# Altium PCB PCB1.PcbDoc
Units mil, origin at the board's own origin, x right, y up, seen from the top; angles counter-clockwise.
Board outline 1470 x 845 mil, 2 copper layers (Top Layer, Bottom Layer); 17 components, 10 nets, 55 pads, 8 vias.
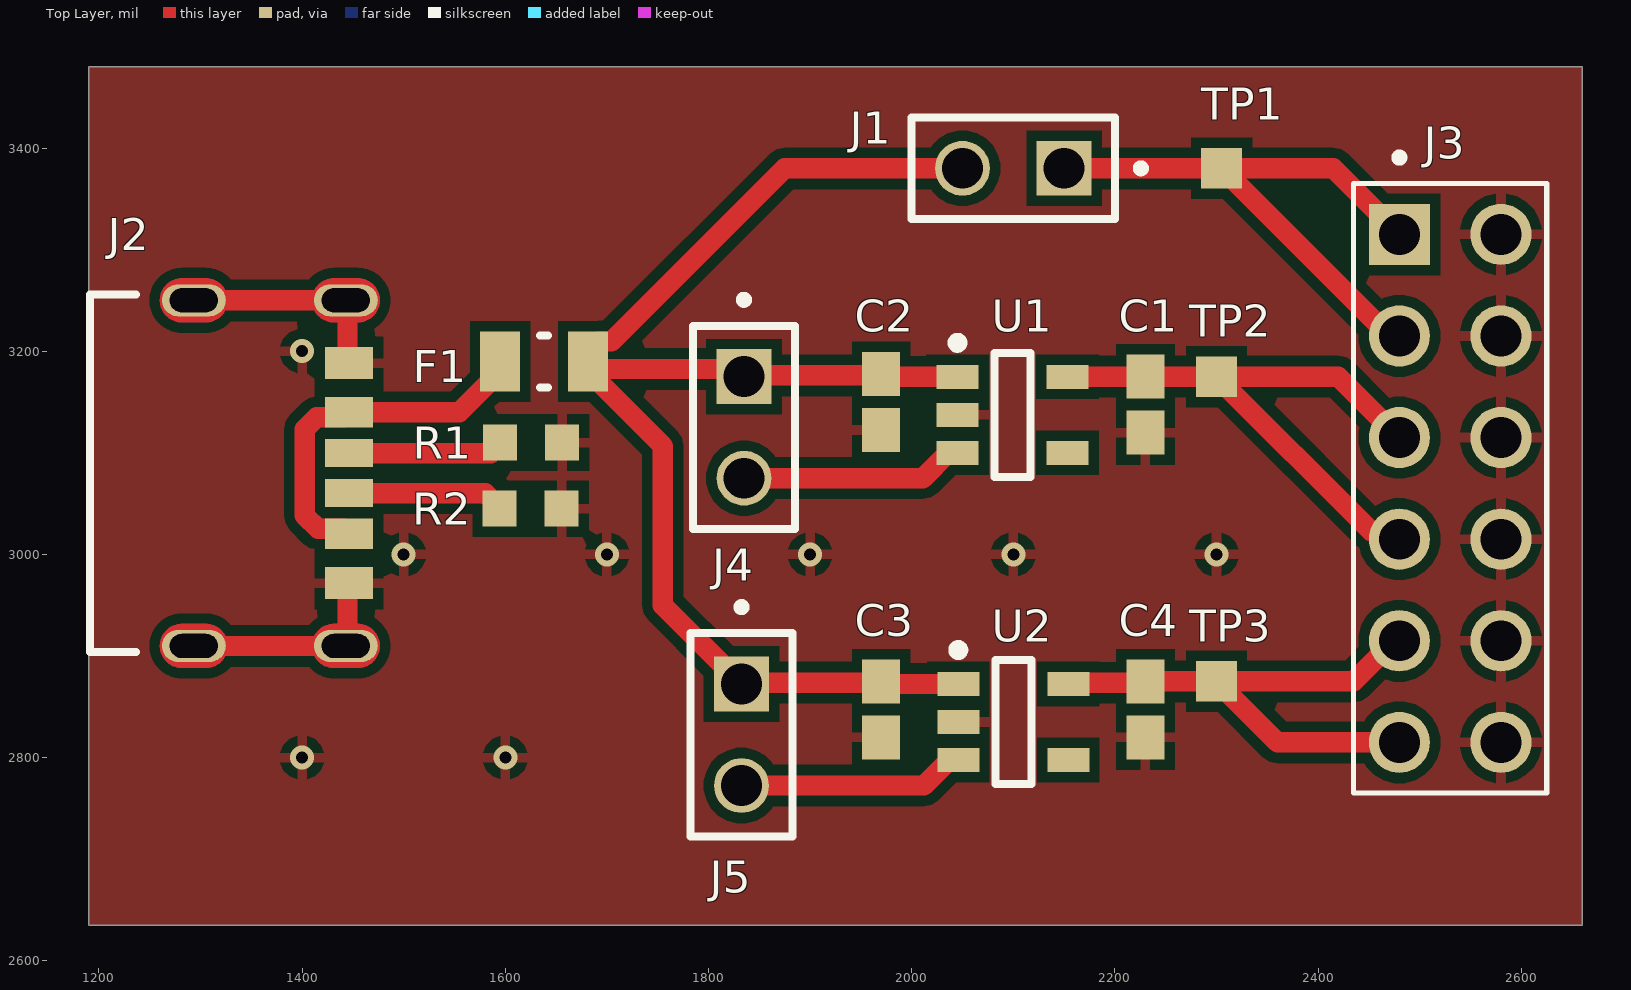
[diagram p0: Top Layer view]
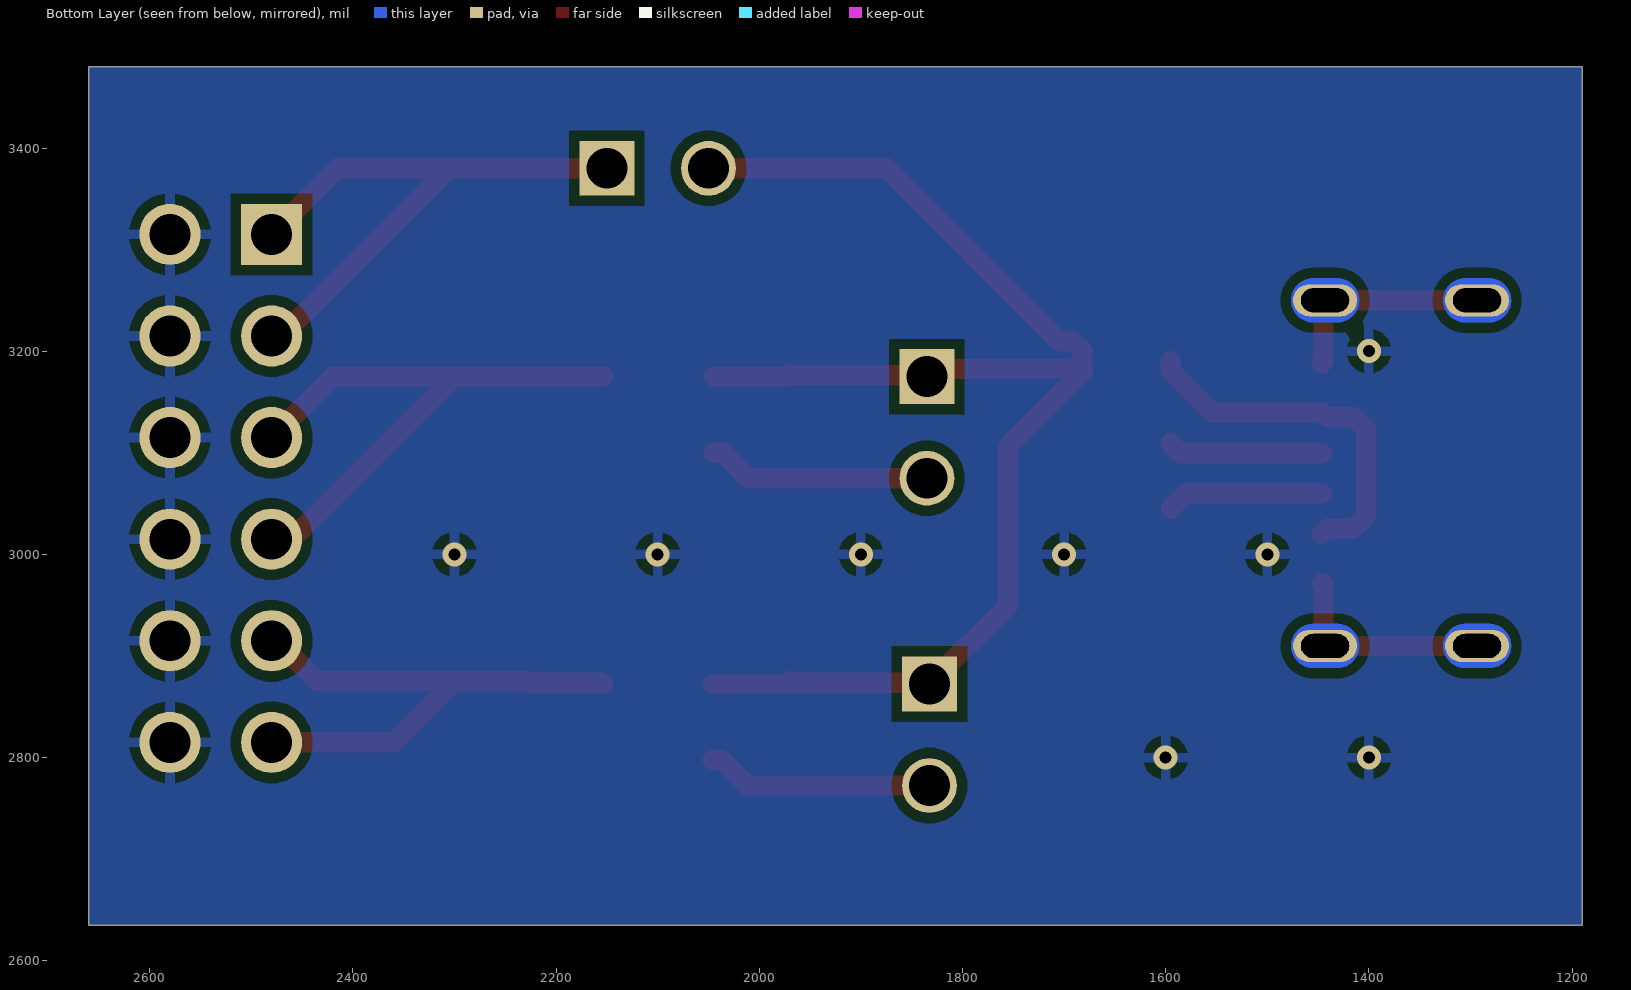
[diagram p1: Bottom Layer view, seen from below]
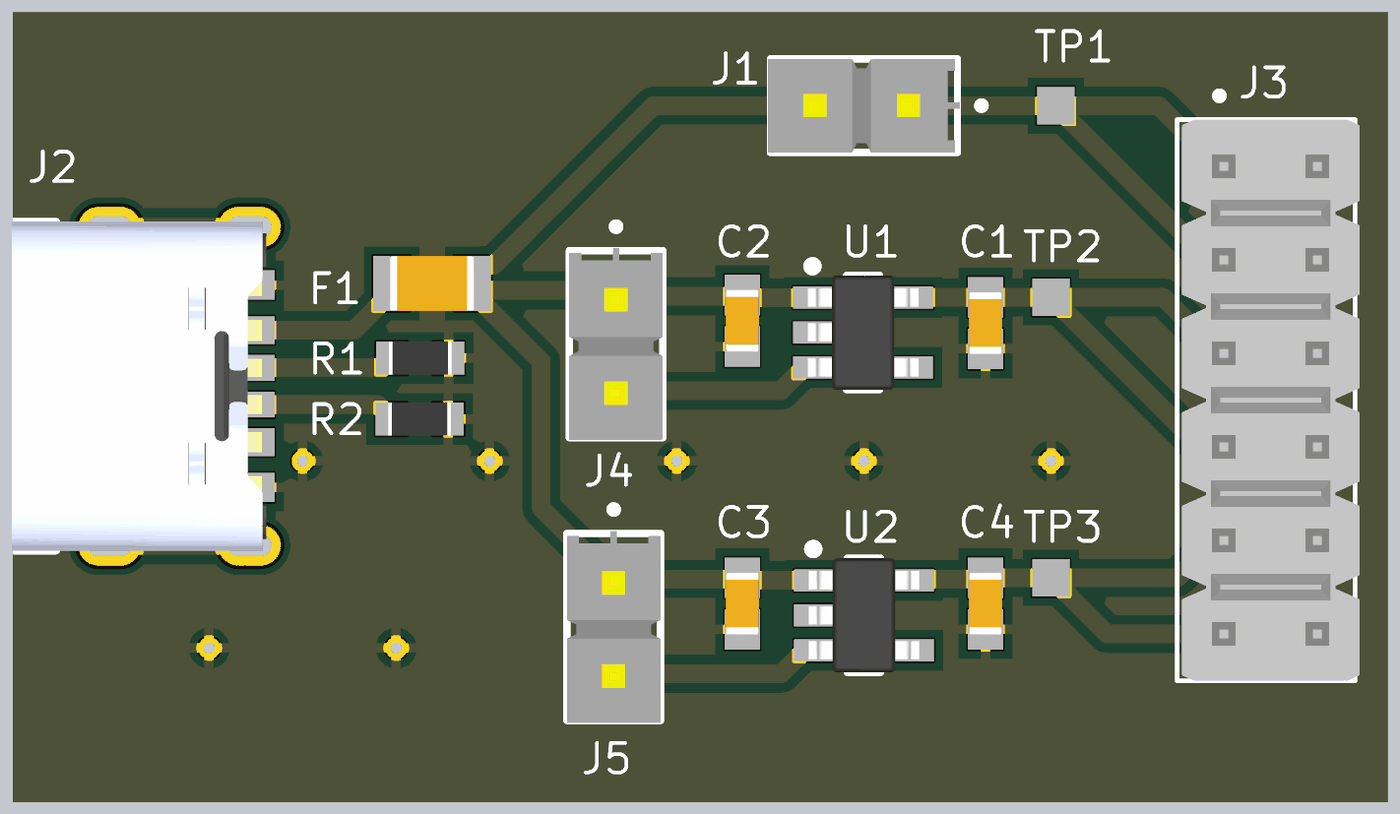
[diagram p2: 3D render of the assembled board from above, using the file's embedded part models]

## Layer stack, top to bottom
Top Solder: solder mask 0.4, Solder Resist, Dk 3.5
Top Layer: signal copper 1.4
Dielectric 1: dielectric 12.6, FR-4, Dk 4.8
Bottom Layer: signal copper 1.4
Bottom Solder: solder mask 0.4, Solder Resist, Dk 3.5

## Board outline
1190,2635 2660,2635 2660,3480 1190,3480

## Design rules (kind name [scope] priority, off if disabled: settings)
Clearance [All] p1: gap=10 ignorepadtopadclearanceinfootprint=FALSE
HoleSize [All] p1: absolutevalues=TRUE maxlimit=100 minlimit=11.81 maxpercent=80.000 minpercent=20.000
HoleToHoleClearance [All] p1: gap=19.68 allowstackedmicrovias=TRUE
MinimumSolderMaskSliver [All] p1: minsoldermaskwidth=3.94
PolygonConnect [All] p1: connectstyle=Relief reliefconductorwidth=10 reliefentries=4 polygonreliefangle="90 Angle" airgapwidth=10
RoutingVias [All] p1: holewidth=28 width=50 viastyle="Through Hole" minholewidth=28 minwidth=50 maxholewidth=28 maxwidth=50
SolderMaskExpansion [All] p1: expansion=1.97 istentingtop=FALSE
SupplyNets "Schematic Supply Nets" [InNet('GND')] p1: voltage=0.000
Width "Power Rule" [InNetClass('Power')] p1: maxlimit=40 minlimit=16 preferedwidth=20
Width Default [All] p2: maxlimit=40 minlimit=8 preferedwidth=10
Width [All] p3: maxlimit=10 minlimit=8 preferedwidth=10
27 further rules are at their usual default settings.

## Components (designator, comment, footprint, x,y, rotation, side; value= is the part's Value field where it differs from the comment)
C1 "1uF" CAP_0603 2230,3147.44 r90 top value="1 uF"
C2 "1uF" CAP_0603 1970,3150 r90 top value="1 uF"
C3 "1uF" CAP_0603 1970,2847.44 r90 top value="1 uF"
C4 "1uF" CAP_0603 2230,2847.44 r90 top value="1 uF"
F1 "MF-PSMF050X-2" MF-PSMF050X 1638.31,3190 r0 top
J1 "TSW-102-07-G-S" TSW-102-07-G-S 2100,3380 r180 top
J2 "USBC_POWERONLY_Horizontal" USBC_POWERDELIVERY_HORIZONTAL 1330,3085 r270 top
J3 "10129381-912002BLF" 10129381-912002BLF 2530,3065 r270 top
J4 "TSW-102-07-G-S" TSW-102-07-G-S 1835,3125 r270 top
J5 "TSW-102-07-G-S" TSW-102-07-G-S 1832.5,2822.5 r270 top
R1 "5.1K" RES_0603 1625.51,3110 r0 top value="5.1 kOhm"
R2 "5.1K" RES_0603 1625,3045 r0 top value="5.1 kOhm"
TP1 "TestPoint_0.4mm" TestPoint_0.4mm_SMD 2305,3380 r90 top
TP2 "TestPoint_0.4mm" TestPoint_0.4mm_SMD 2300,3175 r90 top
TP3 "TestPoint_0.4mm" TestPoint_0.4mm_SMD 2300,2875 r90 top
U1 "AP2112K-3.3TRG1" AP2112K-3.3TRG1 2099.13,3137.4 r0 top
U2 "AP2112K-1.8TRG1" AP2112K-1.8TRG1 2100,2835 r0 top

## Footprints (in the part's own frame and the unit in brackets; to place one, negate y for a bottom-side part, rotate by r counter-clockwise, add the part's x,y. Pads: shape width x height; smd on the part's side, far side on the other; paste and mask are expansions set on the pad)
10129381-912002BLF [mm]
  rect 1.53x1.53 / inner round 1.53 / far side rect 1.53x1.53 hole 1.02: 1(-6.35,-1.27)
  round 1.53 hole 1.02: 2(-6.35,1.27) 3(-3.81,-1.27) 4(-3.81,1.27) 5(-1.27,-1.27) 6(-1.27,1.27) 7(1.27,-1.27) 8(1.27,1.27) 9(3.81,-1.27) 10(3.81,1.27) 11(6.35,-1.27) 12(6.35,1.27)
  silkscreen extent -8.37,-2.41 7.62,2.41, body extent -7.62,-2.29 7.62,2.54, height 8.18
AP2112K-1.8TRG1 [mm]
  rect 1.05x0.6 smd: 1(-1.375,0.95) 2(-1.375,0) 3(-1.375,-0.95) 4(1.375,-0.95) 5(1.375,0.95)
  silkscreen extent -1.5,-1.55 0.45,1.92, body extent -1.5,-1.55 1.5,1.55, height 1.3
AP2112K-3.3TRG1 [mm]
  rect 1.05x0.6 smd: 1(-1.375,0.95) 2(-1.375,0) 3(-1.375,-0.95) 4(1.375,-0.95) 5(1.375,0.95)
  silkscreen extent -1.5,-1.55 0.45,1.92, body extent -1.5,-1.55 1.5,1.55, height 1.3
CAP_0603 [mm]
  rect 1.1x0.95 smd: 1(-0.7,0) 2(0.7,0)
  body extent -0.85,-0.45 0.85,0.45, height 0.9
MF-PSMF050X [mm]
  rect 1x1.5 smd: 1(-1.1,0) 2(1.1,0)
  silkscreen extent -0.1,-0.65 0.1,0.65, body extent -1.15,-0.75 1.15,0.75, height 0.85
RES_0603 [mm] "Chip Resistor, 2-Leads, Body 1.60x0.80mm, IPC Medium Density"
  rect 0.85x0.9 smd: 1(-0.775,0) 2(0.775,0)
  body extent -0.85,-0.45 0.85,0.45, height 0.55
TestPoint_0.4mm_SMD [mil]
  rect 40x40 smd: 1(0,0)
TSW-102-07-G-S [mm]
  rect 1.37x1.37 / inner round 1.37 / far side rect 1.37x1.37 hole 1.02: 1(-1.27,0)
  round 1.37 hole 1.02: 2(1.27,0)
  silkscreen extent -3.29,-1.27 2.54,1.27, body extent -2.6,-1.27 2.6,1.27, height 8.38
USBC_POWERDELIVERY_HORIZONTAL [mm]
  rect 0.7x1.2 smd: A5(-0.373,2.953) B5(0.627,2.953)
  rect 0.76x1.2 smd: A9(1.647,2.953) B9(-1.393,2.953)
  rect 0.8x1.2 smd: A12(2.877,2.953) B12(-2.623,2.953)
  oval 0.8x1.6 hole 0.6 slot 1.2 at 90 deg mask+0: S1(-4.193,2.873) S2(4.447,2.873) S3(-4.193,-0.927) S4(4.447,-0.927)
  Top Layer region: -4.164,-0.078 -4.136,-0.08 -4.107,-0.084 -4.079,-0.089 -4.051,-0.096 -4.023,-0.104 -3.996,-0.114 -3.969,-0.125 -3.943,-0.137 -3.918,-0.151 -3.893,-0.166 -3.87,-0.182 -3.847,-0.2 -3.825,-0.218 -3.804,-0.238 -3.784,-0.259 -3.766,-0.281 -3.748,-0.304 -3.732,-0.327 -3.717,-0.352 -3.703,-0.377 -3.691,-0.403 -3.68,-0.43 -3.67,-0.457 -3.662,-0.485 -3.655,-0.513 -3.65,-0.541 -3.646,-0.57 -3.644,-0.598 -3.643,-0.627 -3.643,-1.227 -3.644,-1.256 -3.646,-1.284 -3.65,-1.313 -3.655,-1.341 -3.662,-1.369 -3.67,-1.397 -3.68,-1.424 -3.691,-1.451 -3.703,-1.477 -3.717,-1.502 -3.732,-1.527 -3.748,-1.55 -3.766,-1.573 -3.784,-1.595 -3.804,-1.616 -3.825,-1.636 -3.847,-1.654 -3.87,-1.672 -3.893,-1.688 -3.918,-1.703 -3.943,-1.717 -3.969,-1.729 -3.996,-1.74 -4.023,-1.75 -4.051,-1.758 -4.079,-1.765 -4.107,-1.77 -4.136,-1.774 -4.164,-1.776 -4.193,-1.777 -4.222,-1.776 -4.25,-1.774 -4.279,-1.77 -4.307,-1.765 -4.335,-1.758 -4.363,-1.75 -4.39,-1.74 -4.417,-1.729 -4.443,-1.717 -4.468,-1.703 -4.493,-1.688 -4.516,-1.672 -4.539,-1.654 -4.561,-1.636 -4.582,-1.616 -4.602,-1.595 -4.62,-1.573 -4.638,-1.55 -4.654,-1.527 -4.669,-1.502 -4.683,-1.477 -4.695,-1.451 -4.706,-1.424 -4.716,-1.397 -4.724,-1.369 -4.731,-1.341 -4.736,-1.313 -4.74,-1.284 -4.742,-1.256 -4.743,-1.227 -4.743,-0.627 -4.742,-0.598 -4.74,-0.57 -4.736,-0.541 -4.731,-0.513 -4.724,-0.485 -4.716,-0.457 -4.706,-0.43 -4.695,-0.403 -4.683,-0.377 -4.669,-0.352 -4.654,-0.327 -4.638,-0.304 -4.62,-0.281 -4.602,-0.259 -4.582,-0.238 -4.561,-0.218 -4.539,-0.2 -4.516,-0.182 -4.493,-0.166 -4.468,-0.151 -4.443,-0.137 -4.417,-0.125 -4.39,-0.114 -4.363,-0.104 -4.335,-0.096 -4.307,-0.089 -4.279,-0.084 -4.25,-0.08 -4.222,-0.078 -4.193,-0.077
  Top Layer region: 4.476,-0.078 4.504,-0.08 4.533,-0.084 4.561,-0.089 4.589,-0.096 4.617,-0.104 4.644,-0.114 4.671,-0.125 4.697,-0.137 4.722,-0.151 4.747,-0.166 4.77,-0.182 4.793,-0.2 4.815,-0.218 4.836,-0.238 4.856,-0.259 4.874,-0.281 4.892,-0.304 4.908,-0.327 4.923,-0.352 4.937,-0.377 4.949,-0.403 4.96,-0.43 4.97,-0.457 4.978,-0.485 4.985,-0.513 4.99,-0.541 4.994,-0.57 4.996,-0.598 4.997,-0.627 4.997,-1.227 4.996,-1.256 4.994,-1.284 4.99,-1.313 4.985,-1.341 4.978,-1.369 4.97,-1.397 4.96,-1.424 4.949,-1.451 4.937,-1.477 4.923,-1.502 4.908,-1.527 4.892,-1.55 4.874,-1.573 4.856,-1.595 4.836,-1.616 4.815,-1.636 4.793,-1.654 4.77,-1.672 4.747,-1.688 4.722,-1.703 4.697,-1.717 4.671,-1.729 4.644,-1.74 4.617,-1.75 4.589,-1.758 4.561,-1.765 4.533,-1.77 4.504,-1.774 4.476,-1.776 4.447,-1.777 4.418,-1.776 4.39,-1.774 4.361,-1.77 4.333,-1.765 4.305,-1.758 4.277,-1.75 4.25,-1.74 4.223,-1.729 4.197,-1.717 4.172,-1.703 4.147,-1.688 4.124,-1.672 4.101,-1.654 4.079,-1.636 4.058,-1.616 4.038,-1.595 4.02,-1.573 4.002,-1.55 3.986,-1.527 3.971,-1.502 3.957,-1.477 3.945,-1.451 3.934,-1.424 3.924,-1.397 3.916,-1.369 3.909,-1.341 3.904,-1.313 3.9,-1.284 3.898,-1.256 3.897,-1.227 3.897,-0.627 3.898,-0.598 3.9,-0.57 3.904,-0.541 3.909,-0.513 3.916,-0.485 3.924,-0.457 3.934,-0.43 3.945,-0.403 3.957,-0.377 3.971,-0.352 3.986,-0.327 4.002,-0.304 4.02,-0.281 4.038,-0.259 4.058,-0.238 4.079,-0.218 4.101,-0.2 4.124,-0.182 4.147,-0.166 4.172,-0.151 4.197,-0.137 4.223,-0.125 4.25,-0.114 4.277,-0.104 4.305,-0.096 4.333,-0.089 4.361,-0.084 4.39,-0.08 4.418,-0.078 4.447,-0.077
  Top Layer region: -4.164,3.722 -4.136,3.72 -4.107,3.716 -4.079,3.711 -4.051,3.704 -4.023,3.696 -3.996,3.686 -3.969,3.675 -3.943,3.663 -3.918,3.649 -3.893,3.634 -3.87,3.618 -3.847,3.6 -3.825,3.582 -3.804,3.562 -3.784,3.541 -3.766,3.519 -3.748,3.496 -3.732,3.473 -3.717,3.448 -3.703,3.423 -3.691,3.397 -3.68,3.37 -3.67,3.343 -3.662,3.315 -3.655,3.287 -3.65,3.259 -3.646,3.23 -3.644,3.202 -3.643,3.173 -3.643,2.573 -3.644,2.544 -3.646,2.516 -3.65,2.487 -3.655,2.459 -3.662,2.431 -3.67,2.403 -3.68,2.376 -3.691,2.349 -3.703,2.323 -3.717,2.298 -3.732,2.273 -3.748,2.25 -3.766,2.227 -3.784,2.205 -3.804,2.184 -3.825,2.164 -3.847,2.146 -3.87,2.128 -3.893,2.112 -3.918,2.097 -3.943,2.083 -3.969,2.071 -3.996,2.06 -4.023,2.05 -4.051,2.042 -4.079,2.035 -4.107,2.03 -4.136,2.026 -4.164,2.024 -4.193,2.023 -4.222,2.024 -4.25,2.026 -4.279,2.03 -4.307,2.035 -4.335,2.042 -4.363,2.05 -4.39,2.06 -4.417,2.071 -4.443,2.083 -4.468,2.097 -4.493,2.112 -4.516,2.128 -4.539,2.146 -4.561,2.164 -4.582,2.184 -4.602,2.205 -4.62,2.227 -4.638,2.25 -4.654,2.273 -4.669,2.298 -4.683,2.323 -4.695,2.349 -4.706,2.376 -4.716,2.403 -4.724,2.431 -4.731,2.459 -4.736,2.487 -4.74,2.516 -4.742,2.544 -4.743,2.573 -4.743,3.173 -4.742,3.202 -4.74,3.23 -4.736,3.259 -4.731,3.287 -4.724,3.315 -4.716,3.343 -4.706,3.37 -4.695,3.397 -4.683,3.423 -4.669,3.448 -4.654,3.473 -4.638,3.496 -4.62,3.519 -4.602,3.541 -4.582,3.562 -4.561,3.582 -4.539,3.6 -4.516,3.618 -4.493,3.634 -4.468,3.649 -4.443,3.663 -4.417,3.675 -4.39,3.686 -4.363,3.696 -4.335,3.704 -4.307,3.711 -4.279,3.716 -4.25,3.72 -4.222,3.722 -4.193,3.723
  Top Layer region: 4.476,3.722 4.504,3.72 4.533,3.716 4.561,3.711 4.589,3.704 4.617,3.696 4.644,3.686 4.671,3.675 4.697,3.663 4.722,3.649 4.747,3.634 4.77,3.618 4.793,3.6 4.815,3.582 4.836,3.562 4.856,3.541 4.874,3.519 4.892,3.496 4.908,3.473 4.923,3.448 4.937,3.423 4.949,3.397 4.96,3.37 4.97,3.343 4.978,3.315 4.985,3.287 4.99,3.259 4.994,3.23 4.996,3.202 4.997,3.173 4.997,2.573 4.996,2.544 4.994,2.516 4.99,2.487 4.985,2.459 4.978,2.431 4.97,2.403 4.96,2.376 4.949,2.349 4.937,2.323 4.923,2.298 4.908,2.273 4.892,2.25 4.874,2.227 4.856,2.205 4.836,2.184 4.815,2.164 4.793,2.146 4.77,2.128 4.747,2.112 4.722,2.097 4.697,2.083 4.671,2.071 4.644,2.06 4.617,2.05 4.589,2.042 4.561,2.035 4.533,2.03 4.504,2.026 4.476,2.024 4.447,2.023 4.418,2.024 4.39,2.026 4.361,2.03 4.333,2.035 4.305,2.042 4.277,2.05 4.25,2.06 4.223,2.071 4.197,2.083 4.172,2.097 4.147,2.112 4.124,2.128 4.101,2.146 4.079,2.164 4.058,2.184 4.038,2.205 4.02,2.227 4.002,2.25 3.986,2.273 3.971,2.298 3.957,2.323 3.945,2.349 3.934,2.376 3.924,2.403 3.916,2.431 3.909,2.459 3.904,2.487 3.9,2.516 3.898,2.544 3.897,2.573 3.897,3.173 3.898,3.202 3.9,3.23 3.904,3.259 3.909,3.287 3.916,3.315 3.924,3.343 3.934,3.37 3.945,3.397 3.957,3.423 3.971,3.448 3.986,3.473 4.002,3.496 4.02,3.519 4.038,3.541 4.058,3.562 4.079,3.582 4.101,3.6 4.124,3.618 4.147,3.634 4.172,3.649 4.197,3.663 4.223,3.675 4.25,3.686 4.277,3.696 4.305,3.704 4.333,3.711 4.361,3.716 4.39,3.72 4.418,3.722 4.447,3.723
  Bottom Layer region: -4.164,-0.078 -4.136,-0.08 -4.107,-0.084 -4.079,-0.089 -4.051,-0.096 -4.023,-0.104 -3.996,-0.114 -3.969,-0.125 -3.943,-0.137 -3.918,-0.151 -3.893,-0.166 -3.87,-0.182 -3.847,-0.2 -3.825,-0.218 -3.804,-0.238 -3.784,-0.259 -3.766,-0.281 -3.748,-0.304 -3.732,-0.327 -3.717,-0.352 -3.703,-0.377 -3.691,-0.403 -3.68,-0.43 -3.67,-0.457 -3.662,-0.485 -3.655,-0.513 -3.65,-0.541 -3.646,-0.57 -3.644,-0.598 -3.643,-0.627 -3.643,-1.227 -3.644,-1.256 -3.646,-1.284 -3.65,-1.313 -3.655,-1.341 -3.662,-1.369 -3.67,-1.397 -3.68,-1.424 -3.691,-1.451 -3.703,-1.477 -3.717,-1.502 -3.732,-1.527 -3.748,-1.55 -3.766,-1.573 -3.784,-1.595 -3.804,-1.616 -3.825,-1.636 -3.847,-1.654 -3.87,-1.672 -3.893,-1.688 -3.918,-1.703 -3.943,-1.717 -3.969,-1.729 -3.996,-1.74 -4.023,-1.75 -4.051,-1.758 -4.079,-1.765 -4.107,-1.77 -4.136,-1.774 -4.164,-1.776 -4.193,-1.777 -4.222,-1.776 -4.25,-1.774 -4.279,-1.77 -4.307,-1.765 -4.335,-1.758 -4.363,-1.75 -4.39,-1.74 -4.417,-1.729 -4.443,-1.717 -4.468,-1.703 -4.493,-1.688 -4.516,-1.672 -4.539,-1.654 -4.561,-1.636 -4.582,-1.616 -4.602,-1.595 -4.62,-1.573 -4.638,-1.55 -4.654,-1.527 -4.669,-1.502 -4.683,-1.477 -4.695,-1.451 -4.706,-1.424 -4.716,-1.397 -4.724,-1.369 -4.731,-1.341 -4.736,-1.313 -4.74,-1.284 -4.742,-1.256 -4.743,-1.227 -4.743,-0.627 -4.742,-0.598 -4.74,-0.57 -4.736,-0.541 -4.731,-0.513 -4.724,-0.485 -4.716,-0.457 -4.706,-0.43 -4.695,-0.403 -4.683,-0.377 -4.669,-0.352 -4.654,-0.327 -4.638,-0.304 -4.62,-0.281 -4.602,-0.259 -4.582,-0.238 -4.561,-0.218 -4.539,-0.2 -4.516,-0.182 -4.493,-0.166 -4.468,-0.151 -4.443,-0.137 -4.417,-0.125 -4.39,-0.114 -4.363,-0.104 -4.335,-0.096 -4.307,-0.089 -4.279,-0.084 -4.25,-0.08 -4.222,-0.078 -4.193,-0.077
  Bottom Layer region: 4.476,-0.078 4.504,-0.08 4.533,-0.084 4.561,-0.089 4.589,-0.096 4.617,-0.104 4.644,-0.114 4.671,-0.125 4.697,-0.137 4.722,-0.151 4.747,-0.166 4.77,-0.182 4.793,-0.2 4.815,-0.218 4.836,-0.238 4.856,-0.259 4.874,-0.281 4.892,-0.304 4.908,-0.327 4.923,-0.352 4.937,-0.377 4.949,-0.403 4.96,-0.43 4.97,-0.457 4.978,-0.485 4.985,-0.513 4.99,-0.541 4.994,-0.57 4.996,-0.598 4.997,-0.627 4.997,-1.227 4.996,-1.256 4.994,-1.284 4.99,-1.313 4.985,-1.341 4.978,-1.369 4.97,-1.397 4.96,-1.424 4.949,-1.451 4.937,-1.477 4.923,-1.502 4.908,-1.527 4.892,-1.55 4.874,-1.573 4.856,-1.595 4.836,-1.616 4.815,-1.636 4.793,-1.654 4.77,-1.672 4.747,-1.688 4.722,-1.703 4.697,-1.717 4.671,-1.729 4.644,-1.74 4.617,-1.75 4.589,-1.758 4.561,-1.765 4.533,-1.77 4.504,-1.774 4.476,-1.776 4.447,-1.777 4.418,-1.776 4.39,-1.774 4.361,-1.77 4.333,-1.765 4.305,-1.758 4.277,-1.75 4.25,-1.74 4.223,-1.729 4.197,-1.717 4.172,-1.703 4.147,-1.688 4.124,-1.672 4.101,-1.654 4.079,-1.636 4.058,-1.616 4.038,-1.595 4.02,-1.573 4.002,-1.55 3.986,-1.527 3.971,-1.502 3.957,-1.477 3.945,-1.451 3.934,-1.424 3.924,-1.397 3.916,-1.369 3.909,-1.341 3.904,-1.313 3.9,-1.284 3.898,-1.256 3.897,-1.227 3.897,-0.627 3.898,-0.598 3.9,-0.57 3.904,-0.541 3.909,-0.513 3.916,-0.485 3.924,-0.457 3.934,-0.43 3.945,-0.403 3.957,-0.377 3.971,-0.352 3.986,-0.327 4.002,-0.304 4.02,-0.281 4.038,-0.259 4.058,-0.238 4.079,-0.218 4.101,-0.2 4.124,-0.182 4.147,-0.166 4.172,-0.151 4.197,-0.137 4.223,-0.125 4.25,-0.114 4.277,-0.104 4.305,-0.096 4.333,-0.089 4.361,-0.084 4.39,-0.08 4.418,-0.078 4.447,-0.077
  Bottom Layer region: -4.164,3.722 -4.136,3.72 -4.107,3.716 -4.079,3.711 -4.051,3.704 -4.023,3.696 -3.996,3.686 -3.969,3.675 -3.943,3.663 -3.918,3.649 -3.893,3.634 -3.87,3.618 -3.847,3.6 -3.825,3.582 -3.804,3.562 -3.784,3.541 -3.766,3.519 -3.748,3.496 -3.732,3.473 -3.717,3.448 -3.703,3.423 -3.691,3.397 -3.68,3.37 -3.67,3.343 -3.662,3.315 -3.655,3.287 -3.65,3.259 -3.646,3.23 -3.644,3.202 -3.643,3.173 -3.643,2.573 -3.644,2.544 -3.646,2.516 -3.65,2.487 -3.655,2.459 -3.662,2.431 -3.67,2.403 -3.68,2.376 -3.691,2.349 -3.703,2.323 -3.717,2.298 -3.732,2.273 -3.748,2.25 -3.766,2.227 -3.784,2.205 -3.804,2.184 -3.825,2.164 -3.847,2.146 -3.87,2.128 -3.893,2.112 -3.918,2.097 -3.943,2.083 -3.969,2.071 -3.996,2.06 -4.023,2.05 -4.051,2.042 -4.079,2.035 -4.107,2.03 -4.136,2.026 -4.164,2.024 -4.193,2.023 -4.222,2.024 -4.25,2.026 -4.279,2.03 -4.307,2.035 -4.335,2.042 -4.363,2.05 -4.39,2.06 -4.417,2.071 -4.443,2.083 -4.468,2.097 -4.493,2.112 -4.516,2.128 -4.539,2.146 -4.561,2.164 -4.582,2.184 -4.602,2.205 -4.62,2.227 -4.638,2.25 -4.654,2.273 -4.669,2.298 -4.683,2.323 -4.695,2.349 -4.706,2.376 -4.716,2.403 -4.724,2.431 -4.731,2.459 -4.736,2.487 -4.74,2.516 -4.742,2.544 -4.743,2.573 -4.743,3.173 -4.742,3.202 -4.74,3.23 -4.736,3.259 -4.731,3.287 -4.724,3.315 -4.716,3.343 -4.706,3.37 -4.695,3.397 -4.683,3.423 -4.669,3.448 -4.654,3.473 -4.638,3.496 -4.62,3.519 -4.602,3.541 -4.582,3.562 -4.561,3.582 -4.539,3.6 -4.516,3.618 -4.493,3.634 -4.468,3.649 -4.443,3.663 -4.417,3.675 -4.39,3.686 -4.363,3.696 -4.335,3.704 -4.307,3.711 -4.279,3.716 -4.25,3.72 -4.222,3.722 -4.193,3.723
  Bottom Layer region: 4.476,3.722 4.504,3.72 4.533,3.716 4.561,3.711 4.589,3.704 4.617,3.696 4.644,3.686 4.671,3.675 4.697,3.663 4.722,3.649 4.747,3.634 4.77,3.618 4.793,3.6 4.815,3.582 4.836,3.562 4.856,3.541 4.874,3.519 4.892,3.496 4.908,3.473 4.923,3.448 4.937,3.423 4.949,3.397 4.96,3.37 4.97,3.343 4.978,3.315 4.985,3.287 4.99,3.259 4.994,3.23 4.996,3.202 4.997,3.173 4.997,2.573 4.996,2.544 4.994,2.516 4.99,2.487 4.985,2.459 4.978,2.431 4.97,2.403 4.96,2.376 4.949,2.349 4.937,2.323 4.923,2.298 4.908,2.273 4.892,2.25 4.874,2.227 4.856,2.205 4.836,2.184 4.815,2.164 4.793,2.146 4.77,2.128 4.747,2.112 4.722,2.097 4.697,2.083 4.671,2.071 4.644,2.06 4.617,2.05 4.589,2.042 4.561,2.035 4.533,2.03 4.504,2.026 4.476,2.024 4.447,2.023 4.418,2.024 4.39,2.026 4.361,2.03 4.333,2.035 4.305,2.042 4.277,2.05 4.25,2.06 4.223,2.071 4.197,2.083 4.172,2.097 4.147,2.112 4.124,2.128 4.101,2.146 4.079,2.164 4.058,2.184 4.038,2.205 4.02,2.227 4.002,2.25 3.986,2.273 3.971,2.298 3.957,2.323 3.945,2.349 3.934,2.376 3.924,2.403 3.916,2.431 3.909,2.459 3.904,2.487 3.9,2.516 3.898,2.544 3.897,2.573 3.897,3.173 3.898,3.202 3.9,3.23 3.904,3.259 3.909,3.287 3.916,3.315 3.924,3.343 3.934,3.37 3.945,3.397 3.957,3.423 3.971,3.448 3.986,3.473 4.002,3.496 4.02,3.519 4.038,3.541 4.058,3.562 4.079,3.582 4.101,3.6 4.124,3.618 4.147,3.634 4.172,3.649 4.197,3.663 4.223,3.675 4.25,3.686 4.277,3.696 4.305,3.704 4.333,3.711 4.361,3.716 4.39,3.72 4.418,3.722 4.447,3.723
  silkscreen extent -4.34,-3.53 4.6,-2.38, body extent -4.34,-3.58 4.6,3.32, height 3.26

## Part data
C1 C2 C3 C4: library part C_1u_0603, "1 uF 10% 0603 X7R MLCC", Dielectric=X7R, Manufacturer=Yageo, Manufacturer Part Number=CC0603KRX7R7BB105, Package (Imperial)=0603, Supplier Part Number 1=603-CC603KRX7R7BB105, Tolerance=10%, Voltage Rating DC="16 VDC", Datasheet=https://yageogroup.com/component-documentation/download/datasheet/CC0603KRX7R7BB105?lang=en, Supplier 1=Mouser, Supplier 2=DigiKey, Supplier Part Number 2=311-1446-1-ND
F1: "PPTC 1V 0.5A", Hold Current="500 mA", Manufacturer=Bourns, Maximum Current="40 A", Maximum Voltage="6 VDC", Package (Imperial)=0805, Supplier Part Number 1=652-MF-PSMF050X-2, Trip Current="1 A", Manufacturer Part Number=MF-PSMF050X-2, Supplier 1=Mouser, Supplier 2=DigiKey, Supplier Part Number 2=MF-PSMF050X-2CT-ND, Termination="Recessed SMD"
J1 J4 J5: "1x2 Headers 2.54 Pitch", Manufacturer=Samtec, Supplier Part Number 1=200-TSW10207GS, ComponentLink1Description=Datasheet, ComponentLink1URL=https://www.mouser.in/datasheet/3/85/1/htsw_th.pdf, Manufacturer Part Number=TSW-102-07-G-S, Number of Positions=2, Number of Rows=1, Pitch="2.54 mm", Supplier 1=Mouser, Supplier 2=DigiKey, Supplier Part Number 2=612-TSW-102-07-G-S-ND
J2: "USB-C, 6 Contact Power Delivery Port", Current Rating="3 A", Manufacturer=GCT, Manufacturer Part Number=USB4125-GF-A-0190, Supplier Part Number 1=640-USB4125-GF-A-190, Voltage Rating="48 VDC", Number of Contacts=6, Standard=USB-PD, Supplier 1=Mouser, Supplier 2=DigiKey, Supplier Part Number 2=2073-USB4125-GF-A-0190DKR-ND, Termination=SMD
J3: "2x6 Headers 2.54 Pitch", Manufacturer="Amphenol FCI", Supplier Part Number 1=649-1012938191202BLF, Manufacturer Part Number=10129381-912002BLF, Mounting Angle=Straight, Mounting Style=SMD, Number of Positions=12, Number of Rows=2, Pitch="2.54 mm", Plating=Gold, Supplier 1=Mouser, Supplier 2=DigiKey, Supplier Part Number 2=10129381-912002BLF-ND
R1 R2: library part R_5.1K_0603, "5.1 kOhm 1% 0603 resistor", Manufacturer=Yageo, Manufacturer Part Number=RC0603FR-075K1L, Package (Imperial)=0603, Power Rating="0.1 W", Supplier Part Number 1=603-RC0603FR-075K1L, Tolerance=1%, Voltage Rating="75 V", ComponentLink1Description=Datasheet, ComponentLink1URL=https://yageogroup.com/content/datasheet/asset/file/PYU-RC_GROUP_51_ROHS_L, Supplier 1=Mouser, Supplier 2=DigiKey, Supplier Part Number 2=311-5.10KHRCT-ND
TP1 TP2 TP3: "SMD Testpoint. No component to be bought."
U1: "600 mA 3.3 V LDO", Input Voltage="5 V", Manufacturer="Diodes Incorporated", Output Current="600 mA", Output Voltage="3.3 V", Package=SOT-25-5, Supplier Part Number 1=621-AP2112K-3.3TRG1, Manufacturer Part Number=AP2112K-3.3TRG1, Supplier 1=Mouser, Supplier 2=DigiKey, Supplier Part Number 2=AP2112K-3.3TRG1DICT-ND, Topology=LDO
U2: "600 mA 1.8 V LDO", Input Voltage="5 V", Manufacturer="Diodes Incorporated", Output Current="600 mA", Output Voltage="1.8 V", Package=SOT-23-5, Supplier Part Number 1=621-AP2112K-1.8TRG1, Manufacturer Part Number=AP2112K-1.8TRG1, Supplier 1=Mouser, Supplier 2=DigiKey, Supplier Part Number 2=AP2112K-1.8TRG1DICT-ND, Topology=LDO

## Via types
v1: diameter 23.62, hole 11.81, Top Layer to Bottom Layer, 8 vias

## Nets (pads, with @x,y where several pads share a name; then routed paths per layer and width w, separated by ;. In a path a pad name is that pad's centre, name@x,y a point inside that pad or via, vN(x,y) a via of type N, cw(c..) or ccw(c..) an arc to the next point about the centre after c; other vN are vias at no path point)
1V8: C4.2 J3.9 J3.11 TP3.1 U2.5 | length 548.4
  Top Layer w20: U2.5 2155.43,2873.7 2228.7,2873.7 C4.2 TP3.1 ; J3.11 2360,2815 TP3.1 ; J3.9 2474.98,2915 2434.98,2875 TP3.1
3V3: C1.2 J3.5 J3.7 TP2.1 U1.5 | length 597.9
  Top Layer w20: U1.5 2153.37,3174.9 2229.9,3174.9 C1.2 TP2.1 ; J3.7 2472.3,3022.7 2452.3,3022.7 TP2.1 ; J3.5 2420,3175 TP2.1
5V: C2.2 C3.2 F1.2 J1.2 J4.1 J5.1 U1.1 U2.1 | length 1400.4
  Top Layer w20: F1.2@1681.61,3180.16 1755,3106.77 1755,2950 J5.1 1833.75,2873.75 1968.75,2873.75 C3.2 1972.6,2872.4 U2.1 ; F1.2 1689.11,3182.5 1827.5,3182.5 J4.1 1836.28,3176.28 1968.72,3176.28 C2.2 1972.76,3174.8 U1.1 ; F1.2@1681.61,3199.84 1691.3,3209.53 1704.53,3209.53 1875,3380 J1.2
GND: C1.1 C2.1 C3.1 C4.1 J2.A12 J2.B12 J2.S1 J2.S2 J2.S3 J2.S4 J3.2 J3.4 J3.6 J3.8 J3.10 J3.12 R1.2 R2.2 U1.2 U2.2 | length 425.4
  Top Layer w20: J2.S4 J2.S2 1444.68,2911.5 1444.68,2970.16 J2.A12 ; J2.S3 J2.S1 1444.68,3248.5 1444.68,3189.84 J2.B12
  other v1: 1400,2800 1600,2800 1500,3000 1700,3000 1900,3000 2100,3000 2300,3000 1400,3200
NetF1_1: F1.1 J2.A9 J2.B9 | length 361.8
  Top Layer w20: J2.A9 1441.3,3025.12 1415.77,3025.12 1402.64,3038.25 1402.64,3123.17 1414.35,3134.88 1441.3,3134.88 J2.B9 1554.68,3139.84 1595,3180.16 F1.1
NetJ1_1: J1.1 J3.1 J3.3 TP1.1 | length 600.3
  Top Layer w20: J1.1 TP1.1 ; J3.3 2470,3215 TP1.1 ; J3.1 2415,3380 TP1.1
NetJ2_A5: J2.A5 R1.1 | length 153.6
  Top Layer w20: J2.A5 1585.67,3099.68 1595,3109.02 R1.1
NetJ2_B5: J2.B5 R2.1 | length 155.1
  Top Layer w20: J2.B5 1580.16,3060.32 1594.49,3045.98 R2.1
NetJ4_2: J4.2 U1.3 | length 220.4
  Top Layer w20: J4.2 2011.14,3075 2036.14,3100 U1.3
NetJ5_2: J5.2 U2.3 | length 223.8
  Top Layer w20: J5.2 2011.91,2772.5 2037.01,2797.6 U2.3
pads on no net: U1.4 U2.4

## Polygon pours and split planes (outlines as drawn)
GND on Bottom Layer "NONET_L-01_P-001" (solid, remove dead copper, pour order 0): 1190,3480 1190,2635 2660,2635 2660,3480
GND on Top Layer "NONET_L-01_P-001" (solid, remove dead copper, pour order 1): 1190,3480 1190,2635 2660,2635 2660,3480

## Silkscreen, mask and mechanical layers (free items; w line width, h text height)
Mechanical 1:
  lines w2: 1190,2635 1190,3340 1190,3480 2660,3480 2660,2635 1190,2635